# Altium PCB AirBnB-v1.0.PcbDoc (part 6 of 6)
Units mil, origin at the board's own origin, x right, y up, seen from the top; angles counter-clockwise.
Board outline 3937 x 3937 mil, 4 copper layers (Top Layer, Signal + GND, Signal + 3v3, Bottom Layer), stack 62.417 mil thick; 240 components, 168 nets, 829 pads, 395 vias.
Unrouted connection lines stored in the file: 6.
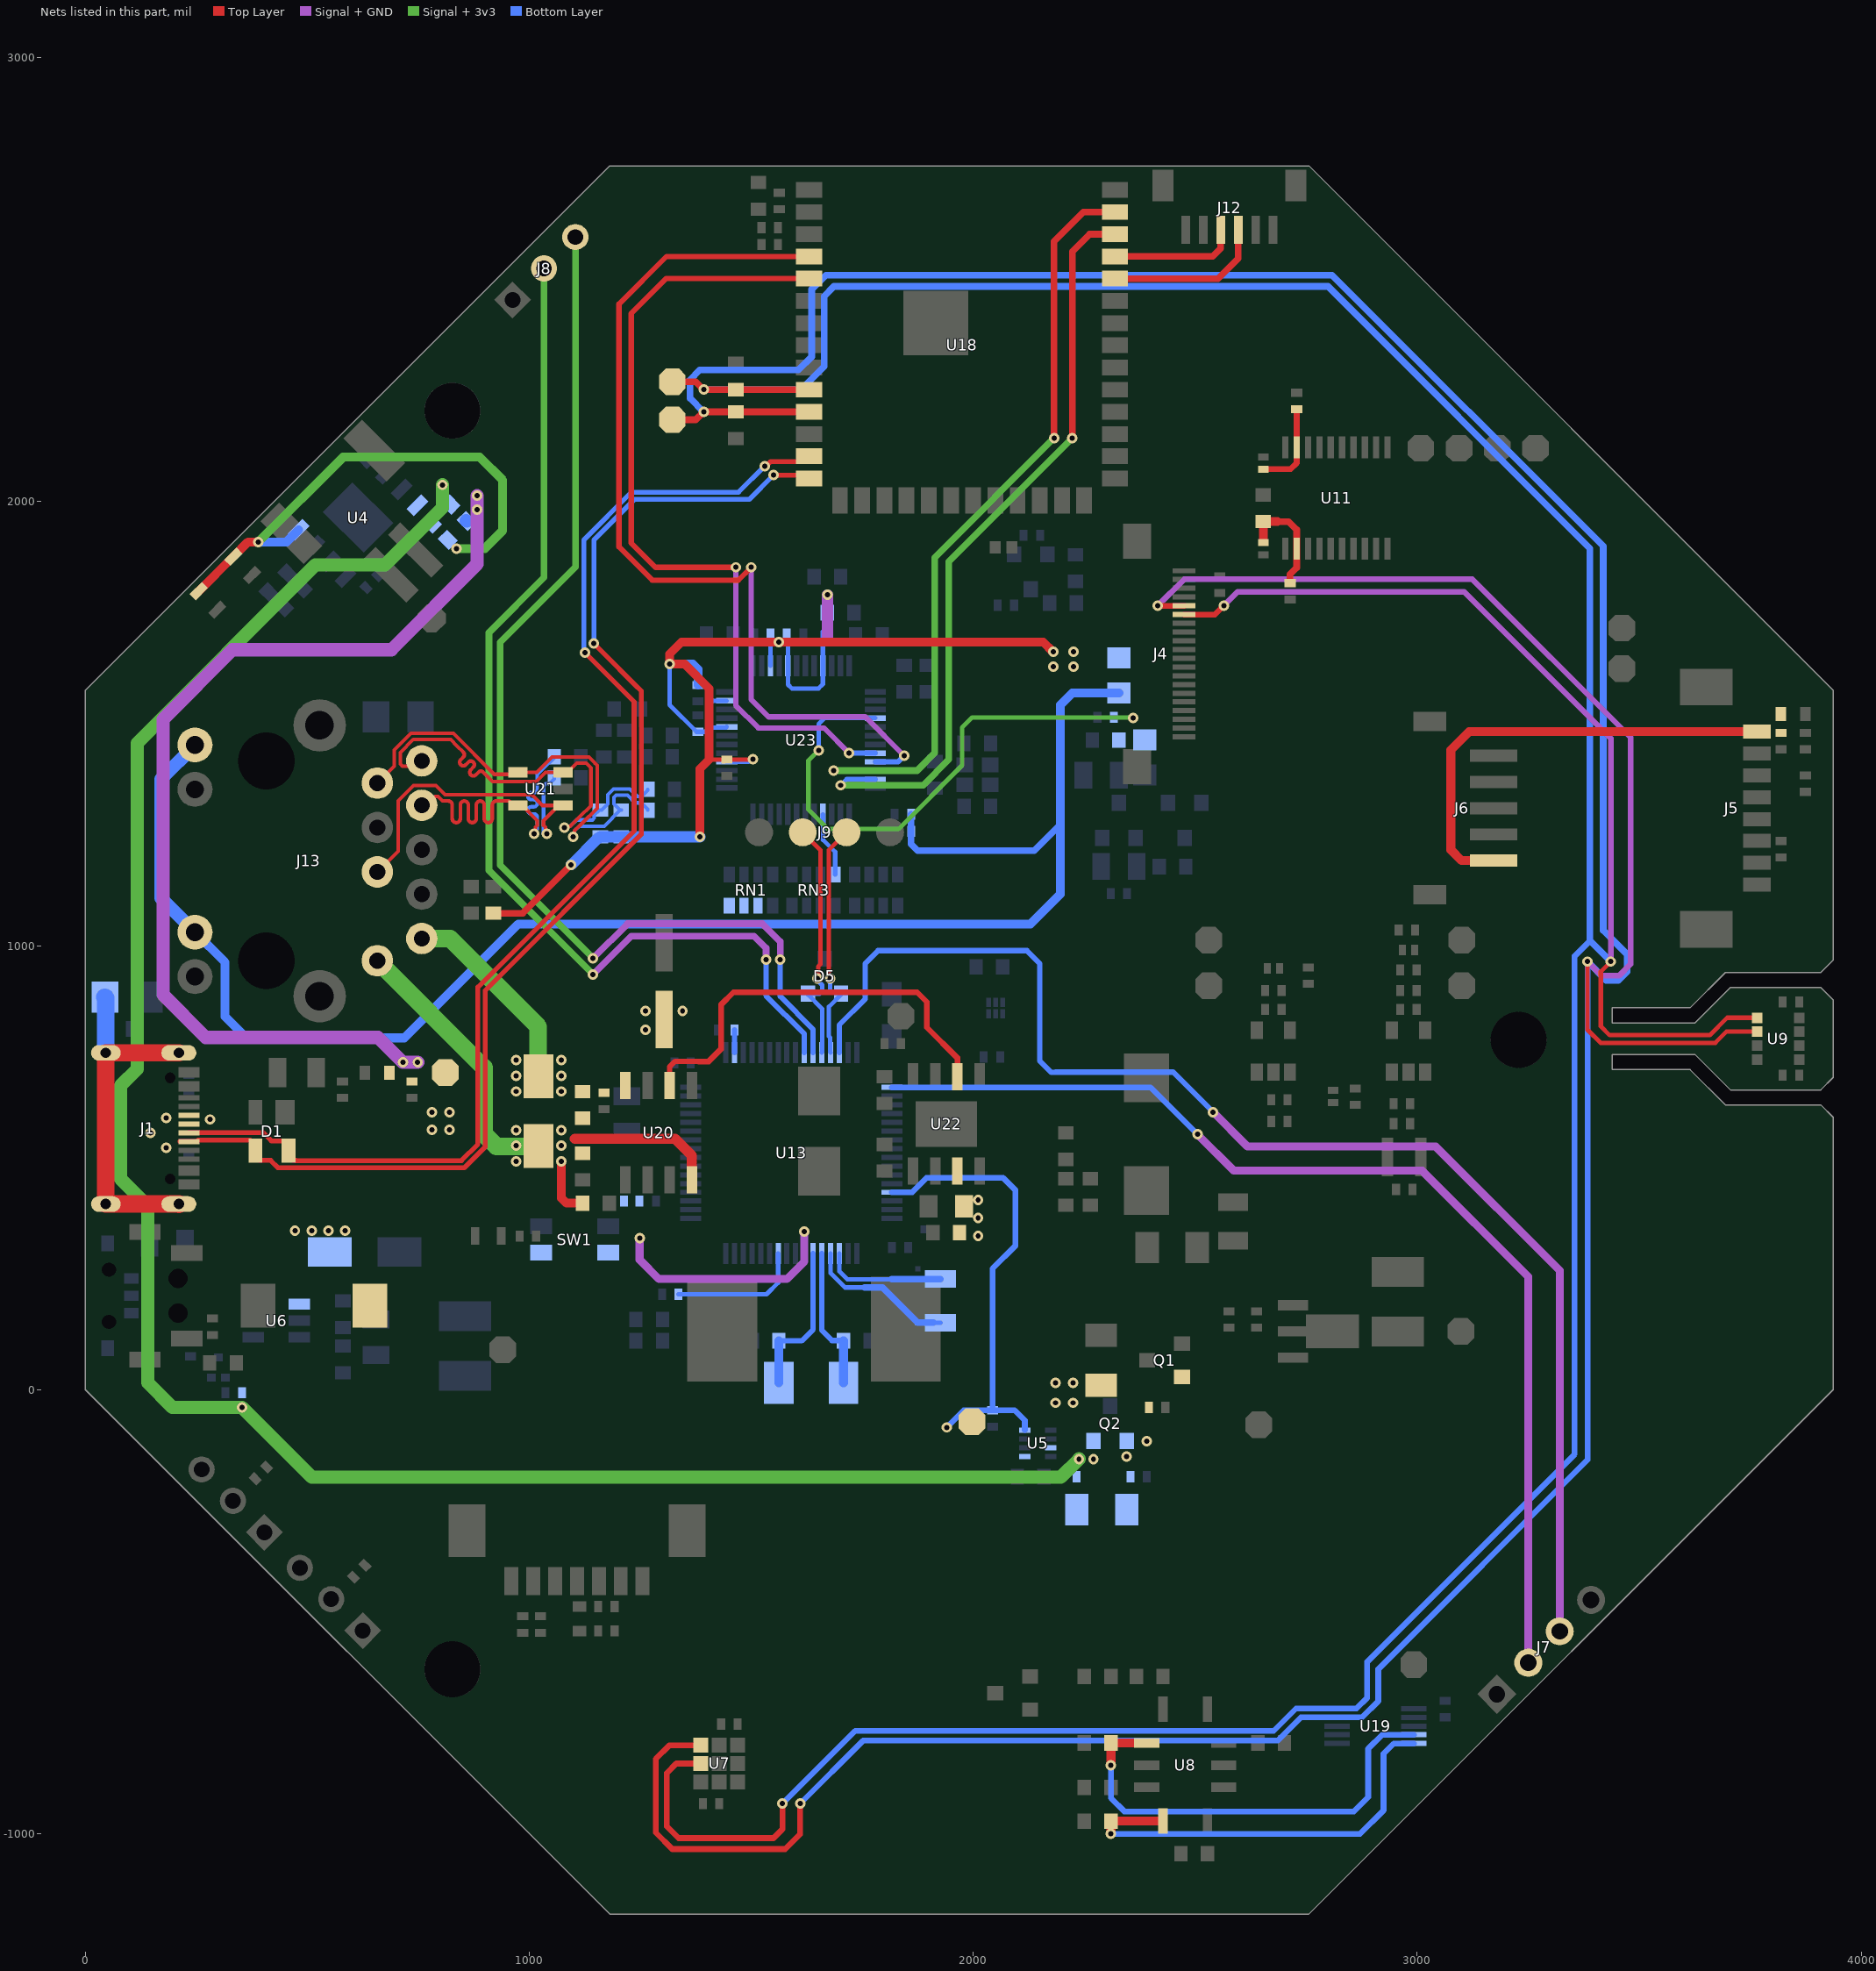
[diagram p5: the nets of this part, all layers, seen from the top]

## Via types
v1: diameter 23.62, hole 11.81, Top Layer to Bottom Layer, 392 vias
v2: diameter 23.62, hole 11.81, Top Layer to Bottom Layer, tented top, 3 vias

## Nets (pads, with @x,y where several pads share a name; then routed paths per layer and width w, separated by ;. In a path a pad name is that pad's centre, name@x,y a point inside that pad or via, vN(x,y) a via of type N, cw(c..) or ccw(c..) an arc to the next point about the centre after c; other vN are vias at no path point) (continued)
NetRN3_8: RN3.8 U23.40 | length 147.1
  Bottom Layer w10: U23.40@1661.21,1295.68 1661.21,1238.49 1688.82,1210.89 RN3.8@1688.82,1160
NetU20_6: U20.6 U22.6 | length 955.4
  Top Layer w12: U20.6@1316.19,685 1316.19,727.56 1327.63,739 1381.25,739
  Top Layer w13: 1381.25,739 1403.89,739 1431.69,766.8 1431.69,866.69 1459.87,894.87 1873.59,894.87 1895.36,873.11 1895.36,815.97 1964.08,747.24 U22.6@1964.08,704.74
NH3: R21.2 U8.D U19.5 | length 987.3
  Top Layer w20: v1(2309.98,-1000.35) R21.2@2309.98,-971.81 U8.D@2427.36,-971.81
  Bottom Layer w13: v1(2309.98,-1000.35) 2871.23,-1000.35 2923.97,-947.62 2923.97,-819.85 2946.81,-797 U19.5@2992.23,-797
NO2: R20.2 U8.A U19.4 | length 1034.7
  Top Layer w20: v1(2309.98,-845.83) R20.2@2309.98,-795.83 U8.A@2390.75,-795.83
  Bottom Layer w13: v1(2309.98,-845.83) 2309.98,-919.84 2339.95,-949.81 2857.13,-949.81 2889.45,-917.49 2889.45,-808.65 2920.79,-777.31 U19.4@2992.23,-777.31
NRST: C37.2 R27.2 SW1.1 U13.7 | length 571.2
  Signal + GND w18: v1(1249,341) 1248.26,340.26 1248.26,292.74 1292,249 1580,249 1619.53,288.53 v1(1619.53,356)
  Bottom Layer w12: U13.7@1619.53,306.62 v1(1619.53,356)
OSCIN: C40.2 U13.3 X1.1 | length 274.7
  Bottom Layer w10: U13.3@1698.27,306.62 1698.27,266.61 1716.11,248.77 1816.38,248.77
  Bottom Layer w15: 1816.38,248.77 C40.2@1874.71,248.77 X1.1@1925.56,248.77
OSCOUT: C46.2 U13.4 X1.2 | length 337.8
  Bottom Layer w10: U13.4@1678.58,306.62 1678.58,262.51 1711.04,230.05 1755,230.05 ; X1.2@1909.5,150.79 X1.2@1926,150.79
  Bottom Layer w15: 1755,230.05 1795.45,230.05 C46.2@1874.71,150.79 X1.2@1909.5,150.79
PB13: SB1.1 U13.34 | length 50.6
  Bottom Layer w12: U13.34@1462.05,759.38 SB1.1@1462.05,810
PC2: SB2.1 U13.10 | length 300.9
  Bottom Layer w10: SB2.1@1336,214.87 1534.37,214.87 1560.47,240.97 U13.10@1560.47,306.62
PMS_5V: C30.2 FB6.1 J5.1 J6.1 | length 1037.7
  Top Layer w20: J6.1@3171.85,1191.39 3099.95,1191.39 3075.58,1215.76 3075.58,1440.58 3116.74,1481.74 J5.1@3765.09,1481.74
POE_PWR_N: C63.1 D6.2 J13.10 R45.1 R47.1 U20.4 | length 1075.7
  Top Layer w20: v1@1073.03,514.11 v1(1072,514.11) 1072,431.72 1083.72,420 R47.1@1120,420
  Top Layer w23: 1102.5,565 1328.46,565 1366.19,527.26 U20.4@1366.19,472.4
  Signal + 3v3 w39.37: J13.10@657.63,965.95 897.89,725.69 897.89,575.91 925.78,548.02 1001.98,548.02
  other v1: 970,514.11 970,549.32 1072,549.32 970,584.52 1072,584.52
POE_PWR_P: C63.2 C67.1 D6.1 J13.9 R46.2 R52.2 R54.2 U20.8 U22.3 | length 455.3
  Signal + 3v3 w39.37: J13.9@757.63,1015.95 821.63,1015.95 1020,817.58 1020,706.8
  other v1: 2010.83,346 2010.83,386.5 2010.83,427 970,671.59 1072,671.59 970,706.8 1072,706.8 970,742 1072,742 1262,810 1262,853 1345.12,853
PWR_STAT: P9.1 R13.1 U5.8 U13.61 | length 1043.7
  Bottom Layer w13: U13.61@1816.38,444.42 1862.18,444.42 1894.44,476.67 2067.32,476.67 2095,449 2095,324.45 2043.39,272.83 R13.1@2043.39,-46.43 ; v1(1940,-85) 1978.57,-46.43 R13.1@2043.39,-46.43 ; U5.8@2116,-91.31 2116,-69.34 2093.09,-46.43 R13.1@2043.39,-46.43
RD_N: C65.1 J13.6 U21.1 | length 820.9
  Top Layer w8: J13.6@657.63,1165.95 704.44,1212.76 704.44,1325.59 739.23,1360.38 788.14,1360.38 789.62,1360.38 810.41,1339.59 886.62,1339.59 1005.82,1339.59 1029.81,1315.6 U21.1@1066.34,1315.6 ; v1(1039.31,1251.52) 1036.32,1254.51 1036.32,1266.73 1032,1271.05 1032,1281.26 U21.1@1066.34,1315.6 ; U21.1@1076.18,1315.6 U21.1@1066.34,1315.6
  Bottom Layer w8: v1@1032,1251.52 1032,1263.05 ; v1(1039.31,1251.52) 1039.31,1255.74 1032,1263.05 ; C65.1@1056,1378 1056,1375.5 1045,1364.5 1036.69,1364.5 1036.49,1364.31 1032,1359.81 1032,1271.39 1032,1263.05
RD_P: C66.1 J13.3 U21.5 | length 820.6
  Top Layer w8: J13.3@757.63,1315.95 759.45,1315.95 767.95,1315.95 787.79,1335.79 794.41,1335.79 804.61,1325.59 817.45,1325.59 cw(c817.45,1316.59) 826.45,1316.59 826.45,1285.91 ccw(c835.45,1285.91) 844.45,1285.91 844.45,1316.59 cw(c853.45,1316.59) 862.45,1316.59 862.45,1285.91 ccw(c871.45,1285.91) 880.45,1285.91 880.45,1316.59 cw(c889.45,1316.59) 898.45,1316.59 898.45,1285.91 ccw(c907.45,1285.91) 916.45,1285.91 916.45,1316.59 cw(c925.45,1316.59) 925.45,1325.59 950.98,1325.59 953.98,1325.59 963.98,1315.6 U21.5@973.82,1315.6 983.66,1315.6 1018,1281.26 1018,1271.05 1013.68,1266.73 1013.68,1254.51 v1(1010.69,1251.52)
  Bottom Layer w8: v1(1010.69,1251.52) 1010.69,1255.74 1018,1263.05 1018,1284.59 1018,1288.59 ccw(c1010,1288.59) 1010,1296.59 1004.58,1296.59 cw(c1004.58,1304.59) 1004.58,1312.59 1010,1312.59 ccw(c1010,1320.59) 1010,1328.59 1004.58,1328.59 cw(c1004.58,1336.59) 1004.58,1344.59 1010,1344.59 ccw(c1010,1352.59) 1018,1352.59 1018,1384 1018,1385.23 1044.27,1411.5 1045,1411.5 1056,1422.5 C66.1@1056,1425
RXD: J12.4 U18.36 | length 361.4
  Top Layer w15: U18.36@2318.95,2502 2551.16,2502 2596.69,2547.52 J12.4@2596.69,2612.3
SCL: J4.6 P13.1 R37.1 U7.2 U9.4 U18.10 U19.10 | length 9720.6
  Top Layer w10: v1(3436,964) 3413.39,941.39 3413.39,818.1 3433.36,798.13 3658.68,798.13 3698.04,837.5 U9.4@3765.51,837.5
  Top Layer w13: U7.2@1386.39,-842 1331.07,-842 1309.93,-863.14 1309.93,-983.71 1336.22,-1010 1550,-1010 1570,-990 v1(1570,-932.27) ; J4.6@2474.76,1745.58 2544.32,1745.58 v1(2564,1765.27)
  Top Layer w15: P13.1@1322,2269.72 1375,2269.72 v1(1392.72,2252) R37.1@1465,2252 U18.10@1629.97,2252
  Signal + GND w13: v1(2564,1765.27) 2595.73,1797 3105.17,1797 3436,1466.17 v1(3436,964)
  Bottom Layer w13: v1(1570,-932.27) 1733.92,-768.35 2676.65,-768.35 2726.74,-718.26 U19.10@2819,-718.26 2862.95,-718.26 2887.31,-693.9 2887.31,-612.69 3354.44,-145.56 3354.44,976.44 3389,1011
  Bottom Layer w15: v1(1392.72,2252) 1611.77,2252 1663.82,2304.05 1663.82,2462.63 1685.74,2484.55 2799.2,2484.55 3389,1894.75 3389,1011 v1(3436,964)
SDA: J4.5 P14.1 R38.1 U7.1 U9.3 U18.11 U19.9 | length 10440.2
  Top Layer w10: v1(3383.4,964) 3383.4,810.58 3412.86,781.12 3671.12,781.12 3696,806 U9.3@3765.51,806
  Top Layer w13: U7.1@1386.39,-800.66 1315.7,-800.66 1285,-831.36 1285,-997.78 1321.91,-1034.69 1576.31,-1034.69 1610,-1001 v1(1610,-932.27) ; v1(2415.27,1765.27) J4.5@2474.76,1765.27
  Top Layer w15: P14.1@1322,2184.28 1375,2184.28 v1(1392.72,2202) R38.1@1465,2202 U18.11@1629.97,2202
  Signal + GND w13: v1(2415.27,1765.27) 2475,1825 3124,1825 3480.46,1468.54 3480.46,958.46 3454.13,932.13 3415.27,932.13 v1(3383.4,964)
  Bottom Layer w13: v1(1610,-932.27) 1751.69,-790.58 2685.47,-790.58 2738.1,-737.94 U19.9@2819,-737.94 2875.73,-737.94 2912.05,-701.63 2912.05,-629.41 3383.4,-158.05 v1(3383.4,964)
  Bottom Layer w15: v1(1392.72,2202) 1362,2232.72 1362,2274 1384,2296 1606,2296 1636,2326 1636,2478 1668,2510 2808.26,2510 3418.88,1899.38 3418.88,1034.3 3472.93,980.25 3472.93,941.71 3453.11,921.89 3425.51,921.89 v1(3383.4,964)
Shell: C2.2 J1.S1 J1.S2 J1.S3 J1.S4 R1.2 | length 796.6
  Top Layer w39.37: J1.S4@210.69,758.5 J1.S3@46.12,758.5 J1.S2@46.12,417.95 J1.S1@210.69,417.95 J1.S1@211.1,417.53
  Bottom Layer w39.37: C2.2@44.12,884 46.12,882 R1.2@46.12,812.5 J1.S3@46.12,758.5
SPI2_CS_IO5: U18.5 U23.32 | length 1877.8
  Top Layer w12: v1(1465,1851.95) 1284.05,1851.95 1229.52,1906.48 1229.52,2423.52 1308,2502 U18.5@1629.97,2502
  Signal + GND w12: v1(1465,1851.95) 1465,1541.16 1516.03,1490.13 1663.61,1490.13 v1(1720.27,1433.47)
  Bottom Layer w12: v1(1720.27,1433.47) U23.32@1779.32,1433.47
SPI2_MISO_IO1: U18.39 U23.34 | length 1766.9
  Top Layer w12: v1@2181.94,2143.22 v1(2182.16,2143)
  Top Layer w15: v1@2181.94,2143.22 2181.94,2585.94 2248,2652 U18.39@2318.95,2652
  Signal + 3v3 w15: v1(1685,1394.1) 1873.33,1394.1 1913.01,1433.79 1913.01,1873.85 v1(2182.16,2143)
  Bottom Layer w12: v1(1685,1394.1) U23.34@1779.32,1394.1
SPI2_MOSI_IO2: U18.38 U23.35 | length 1722
  Top Layer w12: v1@2222.78,2143.22 v1(2223,2143)
  Top Layer w15: v1@2222.78,2143.22 2222.78,2562.78 2262,2602 U18.38@2318.95,2602
  Signal + 3v3 w15: v1(1701.61,1361.03) 1886.92,1361.03 1945,1419.11 1945,1865 v1(2223,2143)
  Bottom Layer w12: v1(1701.61,1361.03) 1715,1374.42 U23.35@1779.32,1374.42
SPI2_SCK_IO4: U18.4 U23.33 | length 2125.8
  Top Layer w12: v1(1500,1851.95) 1471.05,1823 1277,1823 1201.89,1898.11 1201.89,2444.89 1309,2552 U18.4@1629.97,2552
  Signal + GND w12: v1(1500,1851.95) 1500,1554.02 1538.86,1515.16 1756.86,1515.16 v1(1844.33,1427.69)
  Bottom Layer w12: U23.33@1779.32,1413.79 1830.42,1413.79 v1(1844.33,1427.69)
SW_12V: D4.2 L2.2 U6.1
  other v1: 472,358 509.67,358 547.33,358 585,358
SWCLK: J7.2 U13.49 | length 2479.3
  Signal + GND w18: v1(2505,575) 2586.69,493.31 3010.69,493.31 3250,254 J7.2@3250,-615
  Bottom Layer w13: U13.49@1816.38,680.64 2399.36,680.64 v1(2505,575)
SWDIO: J7.3 U13.46 | length 3040.1
  Signal + GND w18: v1(2540,625) 2617.39,547.61 3041.39,547.61 3320.71,268.29 J7.3@3320.71,-544.29
  Bottom Layer w12: U13.46@1698.27,759.38 1698.27,821.43 1756.21,879.38 1756.21,959.4 1785.48,988.67 2120.6,988.67 2150,959.26 2150,740 2175.03,714.97 2184.97,714.97 ; 2185,715 2450,715 v1(2540,625)
TD_N: J13.2 R59.1 R63.1 U21.4 | length 1076
  Top Layer w8: J13.2@657.63,1365.95 695.32,1403.63 695.32,1440.51 732.81,1478 828.8,1478 921.08,1385.72 969.13,1385.72 U21.4@973.82,1390.4 1016.29,1390.4 1050.89,1425 1133.8,1425 1148.59,1410.21 1152.69,1406.11 1152.69,1309.55 1118.23,1275.1 1101.84,1258.7 1101.84,1248.36 v1(1098.85,1245.37)
  Bottom Layer w8: v1(1098.85,1245.37) 1101.84,1248.36 1101.84,1258.7 1112.14,1269 1169.23,1269 1186.5,1286.27 1186.5,1287 R59.1@1204.5,1305 ; R59.1@1207,1305 R59.1@1204.5,1305 ; R63.1@1267,1305 1267,1307.5 1253,1321.5 1237.63,1321.5 1220.71,1338.41 1195.19,1338.41 1190.5,1333.73 1190.5,1319 R59.1@1204.5,1305
TD_P: J13.1 R58.1 R64.1 U21.3 | length 1074.1
  Top Layer w8: J13.1@757.63,1415.95 745.6,1403.92 714,1403.92 709.32,1408.6 709.32,1434.71 738.61,1464 823,1464 837.14,1449.86 851.29,1435.72 cw(c845.63,1430.06) 851.29,1424.4 845.44,1418.56 ccw(c851.1,1412.9) 845.44,1407.25 ccw(c851.1,1412.9) 856.76,1407.25 862.6,1413.09 cw(c868.26,1407.43) 873.91,1413.09 cw(c868.26,1407.43) 873.91,1401.77 868.07,1395.93 ccw(c873.73,1390.28) 868.07,1384.62 ccw(c873.73,1390.28) 879.39,1384.62 885.23,1390.46 cw(c890.88,1384.8) 896.54,1390.46 905.56,1381.44 917.41,1369.59 1016,1369.59 1036.81,1390.4 U21.3@1076.18,1390.4 1086.02,1390.4 1106.62,1411 1128,1411 1138.69,1400.31 1138.69,1315.35 1112.43,1289.1 1091.94,1268.6 1081.6,1268.6 v1(1078.61,1265.61)
  Bottom Layer w8: v1(1078.61,1265.61) 1081.6,1268.6 1091.94,1268.6 1106.34,1283 1141.81,1283 1146.5,1287.69 1146.5,1294 1157.5,1305 1162.5,1305 1176.5,1319 1176.5,1339.53 1189.39,1352.41 1226.51,1352.41 1243.43,1335.5 1253,1335.5 1267,1349.5 R64.1@1267,1352
TXD: J12.3 U18.37 | length 288.1
  Top Layer w15: U18.37@2318.95,2552 2539.32,2552 2557.32,2570 J12.3@2557.32,2612.3
USART1_RX: J8.3 U13.43 | length 2532
  Signal + GND w15: v1(1143.4,971.6) 1221.19,1049.38 1524.47,1049.38 1565,1008.85 v1(1565,968.31)
  Signal + 3v3 w15: J8.3@1103.71,2595.71 1103.71,1852.71 933.98,1682.98 933.98,1181.02 v1(1143.4,971.6)
  Bottom Layer w12: v1(1565,968.31) 1565,885.52 1639.21,811.3 U13.43@1639.21,759.38
USART1_TX: J8.2 U13.42 | length 2446.2
  Signal + GND w15: v1(1143.4,935) 1229.85,1021.45 1506.43,1021.45 1533.19,994.69 v1(1533.19,968.31)
  Signal + 3v3 w15: J8.2@1033,2525 1033,1829 909.05,1705.05 909.05,1169.36 v1(1143.4,935)
  Bottom Layer w12: v1(1533.19,968.31) 1533.19,887.29 1619.53,800.95 U13.42@1619.53,759.38
USB_D_N: D5.2 J9.3 U13.44 | length 562.3
  Top Layer w10: J9.3@1615.79,1255 1655.5,1215.29 1655.5,957.86 1650.45,952.81 1650.45,927.76 v1(1648.69,926)
  Bottom Layer w10: v1(1648.69,926) 1648.69,922.31 1659.8,911.2 1659.8,897.49 1653.95,891.63 D5.2@1627.4,891.63 1627.4,889.66 1659.8,857.26 1659.8,760.28 U13.44@1658.9,759.38
USB_D_P: D5.1 J9.2 U13.45 | length 547.2
  Top Layer w10: v1(1677.31,926) 1674.89,928.42 1674.89,1215.68 J9.2@1714.21,1255
  Bottom Layer w10: v1(1677.31,926) 1677.31,897.61 1680.66,894.26 1699.58,894.26 D5.1@1702.21,891.63 1702.21,889.66 1674.8,862.26 1674.8,795.76 1677.68,792.88 1677.68,760.28 U13.45@1678.58,759.38
USB_N: D1.4 J1.A7 J1.B7 U18.13 | length 2844.6
  Top Layer w11: J1.A7@233.13,578.38 401.17,578.38 419.17,560.38 447.63,560.38 457.87,550.13 457.87,526.51 468.12,516.26 474.07,516.26 474.57,515.76 847.15,515.76 884.24,552.85 884.24,906.47 1236,1258.22 1236,1549 v1(1125,1660) ; v1(1530,2080) 1533.42,2080 1543.2,2089.78 1617.76,2089.78 U18.13@1629.97,2102
  Bottom Layer w11: v1(1125,1660) 1122.93,1662.07 1122.93,1913.48 1230.44,2021 1471,2021 v1(1530,2080)
  other v1: 146.19,578.34 280.62,608.42
USB_P: D1.3 J1.A6 J1.B6 U18.14 | length 2859
  Top Layer w11: J1.B6@213.23,558.62 250.92,558.62 254.17,561.88 371.32,561.88 383.07,550.13 D1.3@383.07,538.32 383.07,526.51 393.32,516.26 417.33,516.26 433.83,499.76 853.78,499.76 900.24,546.22 900.24,898.69 1252,1250.44 1252,1573.48 1238.48,1587 1165.48,1660 v1(1145.24,1680.24) ; v1@1545.78,2064.22 v1(1550.24,2059.76) 1622.21,2059.76 U18.14@1629.97,2052
  Bottom Layer w11: v1(1145.24,1680.24) 1145.24,1913.17 1237.07,2005 1495.48,2005 v1(1550.24,2059.76)
  other v1: 182.12,544.77 182.12,611.84
VBUS: C11.2 D2.2 D3.2 FB2.2 P1.1 Q1.1 Q2.1 R4.1 R8.1 SB4.1 U5.5 | length 2264.2
  Signal + GND w30: v1(748.5,737.43) v1(715,737.43) 659.3,793.13 271.17,793.13 175.16,889.14 175.16,1509.85 331.49,1666.18 689.37,1666.18 882.55,1859.36 v1(882.55,1982) v1(882.55,2013)
  Bottom Layer w30: SB4.1@857.97,1957.42 SB4.1@859.01,1956.37
  other v1: 2345.41,-150.37 2390.86,-115.68 2185,-29.68 2225,-29.68 2185,15 2225,15 781,585 820,585 781,624.93 820,625
VCCA: C34.2 FB7.2 R26.2 U11.2 | length 248.4
  Top Layer w15: 2685.19,1955 2709.83,1955 2728.34,1936.5 U11.2@2728.34,1894.09 2728.34,1850.95 2713.46,1836.07 C34.2@2713.46,1816.47
  Top Layer w20: 2653,1915.74 R26.2@2653,1955 2685.19,1955
VCCB: C35.2 FB8.2 U11.19 | length 202.3
  Top Layer w13: FB8.2@2653,2073 2714.56,2073 2728.34,2086.78 U11.19@2728.34,2122.43 C35.2@2728.34,2208
VCHRG: LED1.1 LED2.1 SB3.2 SB4.2 U4.4 U4.8 | length 1167
  Top Layer w20: LED1.1@255.42,1798.14 LED2.1@333.3,1876.02 ; LED2.1@333.54,1876.02 366.56,1909.04 v1(389.63,1909.04)
  Signal + 3v3 w20: v1(389.63,1909.04) 580.59,2100 888.28,2100 940,2048.28 940,1934.62 899.62,1894.24 v1(835.87,1894.24)
  Bottom Layer w20: v1(389.63,1909.04) 453.09,1909.04 U4.8@480.1,1936.05
VDD: C72.2 C73.2 FB9.2 FB10.1 J13.11 J13.13 R68.1 R69.1 RN1.6 RN1.7 RN1.8 U23.28 | length 4981
  Signal + 3v3 w10: v1(1651.54,1439.77) 1628.59,1416.82 1628.59,1306.41 1672.48,1262.52 1831.56,1262.52 1974.89,1405.84 1974.89,1491.28 1997.61,1514 2359,1514 v1(2360,1513)
  Bottom Layer w10: v1(1651.54,1439.77) 1651.54,1498.83 1664.92,1512.21 U23.28@1779.32,1512.21
  Bottom Layer w15: R68.1@1859.9,1296 R69.1@1859.9,1257 1859.9,1228.8 1874.86,1213.84 2137.65,1213.84 2195.9,1272.1
  Bottom Layer w20: J13.13@247,1030.12 314.35,962.77 314.35,840.53 362.88,792 718.45,792 974.97,1048.52 2128.52,1048.52 2195.9,1115.9 2195.9,1272.1 2195.9,1541.88 2223.02,1569 FB10.1@2328,1569
  Bottom Layer w30: J13.13@247,1030.12 170,1107.12 170,1374.77 J13.11@247,1451.77
VDDA: C77.2 C79.2 C81.2 C82.2 C83.2 C84.2 FB10.2 R50.2 R58.2 R59.2 U23.4 U23.8 U23.11 U23.15 U23.17 U23.21 | length 3064.8
  Top Layer w10: 1405,1418.9 C79.2@1444.68,1418.9 1502.55,1418.9 v1(1503.73,1420.09)
  Top Layer w15: R50.2@919,1073 985,1073 v1(1094,1182)
  Top Layer w20: v1(1384.14,1245) 1384.14,1398.04 1405,1418.9 1405,1579 1350,1634 v1(1316,1634) 1316,1657 1342.53,1683.53 v1(1561.95,1683.53) 2157.49,1683.53 2179.02,1662 v1(2180,1662)
  Signal + GND w25: v1(1671.39,1790) 1671.39,1687.61 1673,1686
  Bottom Layer w10: v1(1316,1634) 1316,1542 1376.5,1481.5 C77.2@1380,1481.5 1402.33,1481.5 1412.06,1491.23 1443.38,1491.23 U23.8@1444.61,1492.46 ; C81.2@1380,1587 1382.04,1584.96 1400.67,1584.96 1406.53,1579.1 1406.53,1557.4 1412.45,1551.47 1444.57,1551.47 U23.11@1444.68,1551.58 ; U23.4@1444.68,1413.79 1493.75,1413.79 ; U23.15@1543.1,1630.32 1543.1,1677.16 1549.47,1683.53 v1(1561.95,1683.53) 1576.11,1683.53 1582.47,1677.16 U23.17@1582.47,1630.32 1582.47,1587.81 1591.18,1579.1 1651.51,1579.1 1661.21,1588.81 U23.21@1661.21,1630.32 1661.21,1707.55 1671.21,1717.55 ; 1671.18,1717.58 C84.2@1671.18,1749.51 C84.2@1671.39,1749.72
  Bottom Layer w20: v1(1316,1634) 1368.28,1634 1380,1622.28 C81.2@1380,1587
  Bottom Layer w25: v1(1094,1182) 1094.5,1182 1155,1242.5 1157.5,1242.5 R58.2@1160,1245 ; R58.2@1165,1245 R59.2@1207,1245 v1(1384.14,1245) ; C84.2@1671.39,1749.72 v1(1671.39,1790)
  other v1: 2180,1628 2225.54,1628 2225.54,1662
VIN1: D3.1 Q2.2 R9.2 R11.2 SB3.1 U5.3 | length 4641.8
  Signal + 3v3 w30: v1(804.21,2037.57) 804.21,1986.21 675.05,1857.05 518.05,1857.05 116.92,1455.92 116.92,721.92 79.58,684.58 79.58,474.41 140.33,413.67 140.33,15.71 196.04,-40 v1(352.75,-40) 509.72,-196.97 2197.3,-196.97 v1(2238,-156.28)
  other v1: 2270.61,-156.28
XTAL_IN: C41.2 U13.5 X2.1 | length 326.7
  Bottom Layer w12: U13.5@1658.9,306.62 1658.9,133.41 1681.67,110.64 1707,110.64 C41.2@1707.64,110
  Bottom Layer w20: X2.1@1707.64,15 C41.2@1707.64,110
XTAL_OUT: C44.2 U13.6 X2.2 | length 353.9
  Bottom Layer w12: C44.2@1561.97,110 1613.62,110 1639.21,135.59 U13.6@1639.21,306.62
  Bottom Layer w20: X2.2@1561.97,15 C44.2@1561.97,110
pads on no net: J1.A8 J1.B8 J1.MH J2.MP1 J2.MP2 J3.1 J3.2 J3.7 J3.8 J3.9 J5.7 J5.8 J5.S1 J5.S2 J6.4 J6.6 J6.7 J9.4 J12.MP1 J12.MP2 J13.MH RN1.4 RN1.5 RN2.1 RN2.2 RN2.7 RN2.8 SW2.MH SW2.MP SW3.2 SW3.4 SW3.5 SW3.MH U1.4 U2.4 U6.6 U7.6 U7.9 U12.5 U13.2 U13.8 U13.9 U13.11 U13.14 U13.15 U13.21 U13.22 U13.24 U13.25 U13.26 U13.27 U13.29 U13.33 U13.35 U13.37 U13.38 U13.39 U13.40 U13.41 U13.50 U13.51 U13.52 U13.53 U13.54 U13.55 U13.56 U13.57 U13.58 U13.59 U13.62 U18.15 U18.16 U18.28 U18.29 U18.30 U19.7 U20.7 U23.7 U23.12 U23.13 U23.18 U23.24 U23.26 U23.46 U23.47

## Polygon pours and split planes (outlines as drawn)
3V3 on Signal + 3v3 "3V3_L03_P003" (solid, pour order 3): 1197,-1149 2747.5,-1149 3908.94,12.44 3908.94,615 3678.2,615 3588.2,705 3425,705 3425,770 3425,810 3425,876.75 3589.95,876.75 3674.2,961 3910,961 3910,1565 2744,2731 1196,2731 28.53,1563.53 28.53,19.47
VBUS on Signal + 3v3 "VBUS_L03_P002" (solid, remove dead copper, pour order 2): 749,19 814,-46 2250,-46 2250,32 879.23,32 845.09,66.13 845.09,650 749,650
GND on Bottom Layer "GND_L04_P012" (solid, remove dead copper, pour order 12): 1198,-1150 2746,-1150 3908.94,12.94 3908.94,597 3889.93,616 3686.44,616 3599,703.44 3425,703.44 3425,775 3425,815.34 3425,877.44 3599,877.44 3682.56,961 3876,961 3908.94,993.94 3908.94,1566.06 2745,2730 1195,2730 28.53,1563.53 28.53,19.47
5V on Bottom Layer "5V_L04_P009" (solid, remove dead copper, pour order 9): 2187.46,-105.09 2159.53,-105.09 2155.74,-101.3 2155.74,35.74 2165,45 2291.87,45 2291.87,220 2075,220 2075,-20.57 2084.11,-29.68 2106.68,-29.68 2133.96,-56.96 2133.96,-100.32 2129.19,-105.09 2102.81,-105.09 2102.81,-116.91 2187.46,-116.91 2102.81,-116.91 2187.46,-116.91
VIN1 on Bottom Layer "VIN1_L04_P005" (solid, pour order 5): 2153.2,-122.9 2192.3,-122.9 2226.6,-88.6 2286.75,-88.6 2286.75,-305.43 2206.43,-305.43 2206.43,-234.2 2220.19,-234.2 2220.19,-136.59 2153.2,-136.59
GND on Top Layer "GND_L01_P011" (solid, remove dead copper, pour order 11): 1198,-1150 2746,-1150 3908.94,12.94 3908.94,576.06 3875,610 3680.5,610 3587.07,703.44 3425,703.44 3425,775 3425,815.34 3425,890 3600,890 3677.26,967.26 3882.26,967.26 3908.94,993.94 3908.94,1565.06 2744,2730 1195,2730 35,1570 35,13
3V3 on Top Layer "3V3_L01_P013" (solid, pour order 13): 2685.77,142.42 2712.41,169.05 2723.35,180 3164,180 3164,-117 3161,-120 2793,-120 2793,92.95 2712.41,92.95 2685.77,119.58
5V on Top Layer "5V_L01_P000" (solid, remove dead copper, pour order 0): 2132.85,95.92 2132.85,220 2480.04,220 2551.54,148.5 2650.5,148.5 2650.5,84.15 2764.41,84.15 2764.41,-120 2520,-120 2520,84.15 2450.5,84.15 2436.96,95.92
GND on Signal + GND "GND_L02_P004" (solid, remove dead copper, pour order 4): 1197,-1149 2747,-1149 3908.94,12.94 3908.94,616.26 3686.18,616.26 3599.38,703.06 3425,703.06 3425,765 3425,815 3425,877.44 3599.38,877.44 3694.2,972.26 3908.94,972.26 3908.94,1565.06 2743,2731 1195,2731 32,1568 32,16

## Other copper
Top Layer:
  region net 5V: 2659,96.09 2659,151.44 2252.57,151.44 2252.57,96.09
  rectangle net 5V: 3309.06,-225 3363,456.73
  region net 5V: 3356,-226 3356,-158.88 2520,-158.88 2520,-226
  region net 5V: 3682.43,1156 3682.43,1205.84 3310,1205.84 3310,1156
  rectangle net 5V: 3310,434.12 3363,1205.17
  region net 5V: 3344,427.92 3344,479.12 2979.45,479.12 2979.45,427.92
  rectangle net Shell: 12.65,397.46 79.58,781.16
  rectangle net 3V3: 2819,-108 3139,178
  rectangle net 5V: 2520,-204 2749.35,84.15
  rectangle net NetR54_1: 1870.15,547 2008.02,649.87
  rectangle net #VBUS: 360.5,597.37 398.82,747.46
  rectangle net GND: 1532,612.52 1700.24,739
  rectangle net POE_PWR_P: 1952.27,333 1975.89,522.65
  rectangle net NetR54_1: 1902.27,387.56 1925.89,649.87
  rectangle net NetR54_1: 1879.08,387.56 1919.08,437.56
  rectangle net NetR54_1: 1902.27,461.63 1925.89,522.65
  rectangle net POE_PWR_P: 1954.08,333 2025.89,440.68
  rectangle net NetC74_2: 1768.95,234.79 2162.07,281.39
  rectangle net NetC74_2: 2094.79,243.01 2162,430.13
  rectangle net NetC74_2: 2094.79,386 2618.47,430.13
  rectangle net NetC74_2: 1768.95,213.89 2105.27,281.39
  rectangle net NetC74_2: 1768.95,17.89 1926.43,281.39
  rectangle net NetC71_1: 1355.57,17.89 1564,254.11
  rectangle net NetC71_1: 1484,17.89 1564,546.78
  rectangle net NetC71_1: 1605.75,461.63 1875.89,507.14
  rectangle net NetC71_1: 1484,436.54 1749,546.78
  rectangle net POE_PWR_P: 1160,762.52 1365,872
  rectangle net POE_PWR_P: 1160,762.52 1323.31,894
  rectangle net POE_PWR_P: 1160,654.49 1228,894
  rectangle net NetC74_2: 2191.08,393.38 2613.5,430.13
  rectangle net #VBUS: 317,670.9 452.76,712
  rectangle net #VBUS: 360.5,670.9 452.76,747.46
  rectangle net NetL2_1: 310,139.79 428.39,274.57
  rectangle net NetL2_1: 295.74,189 428.39,274.57
  rectangle net SW_12V: 594.25,139.79 680.35,376.29
  rectangle net SW_12V: 457.56,286 680.35,376.29
  rectangle net GND: 2449.17,1423 2534,1495.58
  rectangle net 3V3: 2542.5,1822.5 2567.5,1906
  rectangle net 3V3: 2427,1838.1 2567.5,1906
  rectangle net 3V3: 3861.62,1309.5 3886.62,1355.32
  rectangle net 3V3: 3806.5,1181.98 3861.62,1207.68
  rectangle net 3V3: 1452.34,-817.39 1539,-740.77
  rectangle net 5V_BOOST: 896.67,51 997,215
  rectangle net NetR45_2: 1204.38,441.89 1228,502.91
  rectangle net NetR45_2: 1102.5,457.4 1228,487.4
  rectangle net NetR47_2: 1165,402.5 1278,428.05
  rectangle net NetR47_2: 1254.38,402.5 1278,502.91
  rectangle net NetR47_2: 1165,402.5 1195,437.5
  region net NetC74_1: 2246,510.13 2246,460.13 2282.28,460.13 2282.28,510.13
  rectangle net POE_PWR_N: 953,517.4 1137.5,640.57
  rectangle net POE_PWR_P: 953,654.49 1228,755.05
  region net NetC74_1: 2191.08,533.52 2191.08,460.13 2226.08,460.13 2226.08,533.52
  rectangle net 5V: 3849.65,1470 3878.12,1562.12
  rectangle net PMS_5V: 3733.59,1466 3831.5,1537.25
  rectangle net 5V_PoE: 2349.36,49.86 2434.04,82.14
  rectangle net 3V3: 1458,2602 1539.5,2673.5
  rectangle net 3V3: 1460,2643.5 1529.5,2673.5
  rectangle net 3V3: 1460,2649.5 1659.5,2669.72
  rectangle net 3V3: 1600.45,2634.28 1659.5,2669.72
  rectangle net CH2O_5V: 1091.72,-500.91 1124.97,-400
  rectangle net CH2O_5V: 1091.72,-500.91 1163.97,-475.91
  rectangle net 5V: 1058.25,-556.03 1163.97,-531.03
  rectangle net 5V: 2109.87,-663.33 2264.98,-580
  rectangle net 3V3: 3848.19,695.5 3871.81,754.82
  rectangle net 3V3: 3848.19,695.5 3900,720.5
  rectangle net 3V3: 3848.19,860.5 3900,885.5
  rectangle net 3V3: 3848.19,794.19 3871.81,885.5
  rectangle net 3V3_AUD: 1926.35,810 2009.09,900
  rectangle net GPIO21: 218.8,11.91 299,42.11
  rectangle net GPIO21: 193.31,97.13 299,132.56
  rectangle net GPIO21: 265,11.91 299,132.56
  region net BATT: 586.88,1753.63 692.24,1859 653.6,1897.64 548.23,1792.27
  region net BATT: 769.12,1683.69 825.29,1739.87 660.56,1904.6 604.39,1848.43
  region net NetLED1_2: 290.22,1735.51 318.05,1763.34 304.13,1777.26 276.3,1749.43
  region net NetLED2_2: 368.34,1813.38 396.18,1841.22 382.26,1855.14 354.42,1827.3
  rectangle net ESP_EN: 1551,2584.28 1659.5,2619.72
  rectangle net 5V: 3861.62,1470 3886.62,1537.25
  rectangle net GND: 2925.97,2097.63 2955,2225
  rectangle net 1V8_SENSOR: 2681.62,936.63 2767.22,974.34
  rectangle net 1V8: 2624.53,789.8 2669.81,967.36
  region net NetC6_2: 2652.09,774.06 2624.53,774.06 2624.53,695.32 2652.09,695.32
  region net NetC6_2: 2734.49,774.06 2624.53,774.06 2624.53,750.43 2734.49,750.43
  rectangle net NetC6_2: 2698.99,586.5 2734.49,774.06
  rectangle net NetC6_2: 2698.99,586.5 2822.44,654
  rectangle net 3V3_CLEAN: 2798.81,665.81 2872.81,933
  rectangle net 3V3_CLEAN: 2798.81,863.73 2974.1,933
  rectangle net 3V3_SENSOR: 2985.91,978.19 3022.32,1047.5
  rectangle net 3V3_CLEAN: 2928.82,789.8 2974.1,1001.81
  rectangle net NetC4_2: 2920.4,747 3031.18,774.06
  rectangle net NetC4_2: 3003.62,695.32 3031.18,774.06
  rectangle net NetC4_2: 2917.52,480.69 2956.38,774.06
  rectangle net 5V: 2980.1,435 3024.87,569.51
  rectangle net PWR_STAT: 1926,-104 2028,-37
  rectangle net VBUS: 2330,-170 2404.5,36.08
  rectangle net VBUS: 760,565 841,757.79
  rectangle net VBUS: 673.23,680.54 841,757.78
  rectangle net NetC8_2: 500,680.54 641.73,747.46
  rectangle net #VBUS: 268.11,466.63 323.92,505.54
  rectangle net #VBUS: 209.5,481.92 323.92,505.54
  rectangle net USB_N: 267,591.23 293.79,623.65
  rectangle net USB_N: 209.5,611.84 293.79,623.65
  rectangle net USB_P: 169.71,592.16 256.75,603.97
  rectangle net USB_P: 169.71,592.16 197.5,623.86
  rectangle net USB_P: 169.71,529.21 197.5,564.45
  rectangle net USB_N: 132.62,572.47 256.75,584.28
  rectangle net USB_P: 169.71,552.79 256.75,564.45
  rectangle net #VBUS: 209.5,670.9 452.76,694.52
  rectangle net VBUS: 2164.89,-52.5 2404.5,36.08
  rectangle net VBUS: 2452.26,-16.68 2488.48,44.74
  rectangle net VBUS: 2252.57,-16.68 2488.48,36.08
  rectangle net 5V_PoE: 2346.25,243 2436.96,355.43
  rectangle net NetD8_2: 2477.85,284.57 2618.47,355.43
  rectangle net NetC74_2: 2339.41,393.38 2618.47,530.85
  region net NetC74_1: 2191.08,510.13 2191.08,480.13 2282.28,480.13 2282.28,510.13
  rectangle net POE_PWR_N: 953,499.14 1088,640.57
  rectangle net POE_PWR_P: 953,656.62 1088,755.05
  rectangle net NetC64_1: 851.5,1118 936.5,1148
  pour cut-out: 3425,755 3625.5,755 3705.5,675 3908.94,675 3937,703.06 3937,877.44 3908.94,905.5 3705.51,905.5 3625.5,825.5 3439,825.5 3625.5,825.5 3425,825.5
  pour cut-out: 610,1574.8 610,810 0,810 0,1574.8
Signal + GND:
  region net VDDA: 1543.28,1385 1543.28,1470 1270.28,1470 1270.28,1385
  rectangle net VDDA: 1305,1195 1413,1468
  rectangle net VDDA: 1077,1136 1413,1220
  region net VDDA: 1329.3,1178 1329.3,1677 1209.3,1677 1209.3,1178
  rectangle net VDDA: 1516,1594 2256,1714
  rectangle net BATT: 46.12,474.44 125.68,519.46
  rectangle net BATT: 357.49,1759 606,1810.11
  rectangle net VBUS: 867.19,1966.86 897.93,2026.05
  rectangle net BATT: 81.15,270.35 125.68,328.38
  region net BATT: 136.06,1531.33 393.55,1771.44 357.49,1810.11 100,1570
  rectangle net BATT: 93.91,659.13 140,1570
  rectangle net BATT: 46.12,659.13 140,704.14
  rectangle net BATT: 46.12,474.44 85.49,704.14
  rectangle net BATT: 89.64,270.35 125.68,513.81
  pour cut-out: 3425,755 3625.5,755 3705.5,675 3908.94,675 3937,703.06 3937,877.44 3908.94,905.5 3705.51,905.5 3625.51,825.5 3439,825.5 3625.51,825.5 3425,825.5
  pour cut-out: 610,1574.8 610,810 0,810 0,1574.8
Signal + 3v3:
  rectangle net POE_PWR_P: 1323.17,406.72 2036.17,466
  rectangle net POE_PWR_P: 1956.27,331.36 2036.17,466
  rectangle net POE_PWR_P: 1323,406.72 1391.09,868.62
  rectangle net POE_PWR_P: 1247.1,790 1391.09,868.62
  rectangle net VIN1: 2222.31,-170.08 2285,-140
  rectangle net 3V3_AUD: 1926.35,810 2009.09,900
  rectangle net POE_PWR_P: 953,656.62 1088,755.05
  rectangle net POE_PWR_N: 953,499.14 1088,597.57
  pour cut-out: 3425,755 3625.5,755 3705.5,675 3908.94,675 3937,703.06 3937,877.44 3908.94,905.5 3705.51,905.5 3625.5,825.5 3439,825.5 3625.5,825.5 3425,825.5
  pour cut-out: 610,1574.8 610,810 0,810 0,1574.8
Bottom Layer:
  rectangle net 3V3: 2859,-160 3044,89
  rectangle net 5V: 2515,-162 2764,56
  rectangle net NetR54_1: 1870.15,547 2008.02,649.87
  rectangle net 3V3_AUD: 1861,735.76 1905,900
  rectangle net NRST: 1204.5,412.23 1265.72,437.5
  rectangle net NRST: 1001.61,290.76 1248.5,326.66
  rectangle net 3V3_AUD: 1731.73,307 1825.38,330.24
  rectangle net NetL2_1: 295.74,100.64 345.02,274.57
  rectangle net SW_12V: 457.56,276.54 599.47,376.29
  rectangle net SW_12V: 457.56,180.71 547.61,376.29
  rectangle net #VBUS: 325.85,663 398,705.51
  region net NetQ5_3: 2187.09,1820.37 2082.76,1820.37 2082.76,1754 2187.09,1754
  region net GPIO47: 2182.7,1936.5 2138.66,1936.5 2138.66,1862.89 2182.7,1862.89
  region net GPIO47: 2247.44,1899.11 2150.42,1899.11 2150.42,1862.89 2247.44,1862.89
  region net 3V3: 2122.34,1936.5 2075.61,1936.5 2075.61,1862.89 2122.34,1862.89
  region net NetR7_1: 647.78,2179.9 623.82,2155.94 646.82,2132.94 670.78,2156.9
  rectangle net NetC68_2: 1150.5,1470 1208.5,1550.5
  rectangle net 3V3: 2963.69,-718.26 3075.5,-645
  rectangle net 3V3_AUD: 1792.76,351.96 1905.72,372.16
  region net BATT: 591.93,1748.58 647.26,1803.91 595.32,1855.84 539.99,1800.51
  rectangle net VIN1: 340.53,-55 367.45,5.5
  region net VIN1: 791.08,2003.42 824.4,2036.73 804.14,2056.99 770.82,2023.68
  region net VIN1: 848.33,1994.22 794.84,2047.7 770.82,2023.68 824.3,1970.19
  region net VCHRG: 860.73,1897.6 748.9,2009.42 723.05,1983.57 834.87,1871.74
  region net VCHRG: 773.16,2000.27 756.45,2016.97 723.05,1983.57 739.75,1966.86
  rectangle net VBUS: 866.96,1968.59 895.97,2025.11
  region net VBUS: 860.78,1933.39 895.97,1968.59 871.22,1993.34 836.03,1958.14
  rectangle net 5V: 2060.72,731.5 2081.24,856.43
  rectangle net VDDA: 1534,1672.16 1589,1714.5
  rectangle net BATT: 80.43,274.57 164.5,359.67
  rectangle net BATT: 124.5,199.49 164.5,359.67
  rectangle net 3V3: 2251.13,1008.68 2440,1082.5
  rectangle net NRST: 1230.28,290.76 1265.72,437.5
  rectangle net 3V3_AUD: 1731.73,735.76 1905,823.71
  rectangle net 3V3_AUD: 1792.76,351.96 1840,391.27
  rectangle net 3V3_AUD: 1792.76,307 1825.38,391.27
  rectangle net 3V3_AUD: 1731.73,283 1752.64,330.24
  rectangle net 3V3_AUD: 1861,810 2006.74,900
  rectangle net 3V3_AUD: 1926.39,861.95 2040.25,900
  rectangle net NetC39_2: 2060.72,861.94 2081.24,969.5
  rectangle net NetC39_2: 2051.24,934.5 2081.24,969.5
  rectangle net 5V: 2051.24,731.5 2081.24,825.68
  rectangle net 5V: 2023.35,810 2081.24,825.68
  rectangle net 5V: 2023.35,810 2040.25,856.43
  rectangle net VDD: 1437.21,1038.81 1525,1108.03
  rectangle net VDDA: 2152,1612.04 2353.98,1680
  rectangle net VDD: 2302.02,1439.75 2411.98,1592.62
  rectangle net NetC70_2: 2308,1361.01 2411.98,1414
  rectangle net NetC70_2: 2308,1303.26 2348,1414
  rectangle net NetQ7_3: 2459.86,1160.5 2493.74,1260.74
  rectangle net NetC69_1: 2337.5,1104.5 2433.74,1195.5
  rectangle net NetC69_1: 2337.5,1104.5 2388,1260.74
  rectangle net 3V3: 2251.13,1008.68 2318.5,1260.74
  rectangle net NetC85_2: 2019.3,1296 2056.7,1378.69
  rectangle net NetC80_2: 1964,1390.5 1999.61,1473
  rectangle net NetC80_2: 1895.99,1390.5 1999.61,1429.5
  rectangle net NetR63_2: 1420.66,1343.99 1468.69,1361.03
  rectangle net 5V_BOOST: 625,131.57 996.69,215
  rectangle net 5V_BOOST: 562.5,185 996.69,215
  rectangle net 5V_BOOST: 658.53,131.57 756.95,343.46
  region net SW_12V: 547.61,180.71 547.61,211.25 457.56,211.25 457.56,180.71
  rectangle net FB_12V: 457.56,105.91 597.5,130.32
  rectangle net FB_12V: 562.5,83 597.5,155
  rectangle net BATT: 80.43,199.49 164.5,223.11
  rectangle net NetQ3_3: 354.41,63.64 402.44,130.32
  rectangle net NetQ3_3: 222.5,63.64 401.75,87.77
  rectangle net NetL2_1: 80.43,100.64 345.02,136.89
  rectangle net NetL2_1: 305.65,143.31 402.44,167.72
  region net NetL2_1: 113.11,100.64 113.11,183.74 80.43,183.74 80.43,100.64
  rectangle net VBUS: 2025,-345 2371.79,-320
  rectangle net VBUS: 2025,-345 2055.32,-144.46
  rectangle net VBUS: 2025,-158.2 2129.19,-144.46
  rectangle net GND: 2161.08,-97.22 2187.46,-64.44
  rectangle net GND: 2161.08,-91.02 2227.95,-64.44
  rectangle net NetR9_1: 2144,-213.5 2204.81,-178.5
  rectangle net NetR9_1: 2161.08,-208.5 2204.81,-144.46
  rectangle net VBUS: 2319.03,-345 2371.79,-234.57
  rectangle net VBUS: 2319.03,-345 2362.86,-97.57
  rectangle net VBUS: 2319.03,-170 2404.5,-97.57
  rectangle net #VBUS: 359,465.48 398,705.51
  rectangle net #VBUS: 268.11,465.48 398,505.54
  rectangle net USB_N: 268,591.23 293,645
  rectangle net USB_N: 134.4,629.66 293,645
  rectangle net USB_N: 134.19,565.34 158.19,645
  rectangle net USB_P: 170.2,529.21 195.19,624
  rectangle net 5V_PoE: 2291.87,-55.05 2436.96,-18.83
  rectangle net 5V_PoE: 2346.25,-55.05 2436.96,273
  rectangle net NetC68_2: 1150.5,1470 1232.5,1500
  pour cut-out: 3425,755 3625.5,755 3705.5,675 3908.94,675 3937,703.06 3937,877.44 3908.94,905.5 3705.51,905.5 3625.5,825.5 3439,825.5 3625.5,825.5 3425,825.5
  pour cut-out: 610,1574.8 610,810 0.15,810 0,810.15 0,1574.8

## Silkscreen, mask and mechanical layers (free items; w line width, h text height)
Top Overlay:
  drawing of 333 lines, arcs and shapes, not listed
  text "SCL" at 1163.95,2250.32 h39.37
  text "SDA" at 1163.95,2164.88 h39.37
  text "B1" at 3027.69,2161.02 h39.37 r90
  text "B4" at 3113.69,2161.02 h39.37 r90
  text "B3" at 3199.69,2161.02 h39.37 r90
  text "B2" at 3285.69,2161.02 h39.37 r90
  text "1" at 2476,1927.43 h40 r270
  text "-" at 806.72,1891.68 h60 r45
  text "CHARGING" at 391.12,1791.31 h40 r315
  text "BATT" at 821.16,1751.32 h39.37 r45
  text "+" at 648.61,1732.51 h60 r45
  text "PWR" at 312.99,1712.54 h40 r315
  text "PMS_RX" at 3226.09,1695.37 h39.37
  text "PMS_TX" at 3226.09,1603.37 h39.37
  text "3v3_Clean" at 2287.56,992.52 h39.37
  text "3v3_Sensor" at 3135.67,990.32 h39.37
  text "GND" at 3139.67,890.32 h39.37
  text "ETH_PWR_OK" at 1710,881.62 h40
  text "1v8_Sensor" at 2285.64,879.32 h39.37
  text "VBUS" at 889.68,622.48 h39.37 r90
  text "3v3" at 3137.94,112.32 h39.37
  text "5V_Boost" at 977.8,70.32 h39.37
  text "PWR_STAT" at 1892.64,-150.37 h39.37
  text "5V" at 2583.94,-159.68 h39.37
  text "ADS Ready" at 2755,-639 h39.37
Bottom Overlay:
  drawing of 3089 lines, arcs and shapes, not listed
  text "ZERO CARBON FOOTPRINT" at 2421,-893 h45
Dimension:
  text "1" at 2476,1927.43 h40 r270
Board Outline:
  lines w10: 3439,755 3439,825.5 ; 3439,755 3439,720.55 3614.62,720.55 3693.87,641.31 3908.94,641.31 3937,613.25 3937,0 2755.9,-1181.1 1181.1,-1181.1 0,0 0,1574.8 1181.1,2755.9 2755.9,2755.9 3937,1574.8 3937,967.26 3908.94,939.2 3693.87,939.2 3614.62,859.95 3439,859.95 3439,825.5 ; 3439,755 3625.5,755 3705.5,675 3908.94,675 3937,703.06 3937,877.44 3908.94,905.5 3705.5,905.5 3625.5,825.5 3439,825.5
Fabrication:
  drawing of 295 lines, arcs and shapes, not listed
  text "Layer" at 4160.34,2932 h60
  text "Name" at 4570.26,2932 h60
  text "Material" at 5500,2932 h60
  text "Thickness" at 6359.77,2932 h60
  text "Constant" at 7009.6,2932 h60
  text "Board Layer Stack" at 7579.46,2932 h60
  text "Top Overlay" at 4570.26,2812 h60
  text "Top Solder" at 4570.26,2692 h60
  text "Solder Resist" at 5500,2692 h60
  text "0.39mil" at 6359.77,2692 h60
  text "3.3" at 7009.6,2692 h60
  text "1" at 4160.34,2572 h60
  text "Top Layer" at 4570.26,2572 h60
  text "1.38mil" at 6359.77,2572 h60
  text "Dielectric 2" at 4570.26,2452 h60
  text "FR-4" at 5500,2452 h60
  text "8.27mil" at 6359.77,2452 h60
  text "4.6" at 7009.6,2452 h60
  text "2" at 4160.34,2332 h60
  text "Signal + GND" at 4570.26,2332 h60
  text "CF-004" at 5500,2332 h60
  text "0.60mil" at 6359.77,2332 h60
  text "Dielectric 1" at 4570.26,2212 h60
  text "FR-4" at 5500,2212 h60
  text "41.93mil" at 6359.77,2212 h60
  text "4.6" at 7009.6,2212 h60
  text "3" at 4160.34,2092 h60
  text "Signal + 3v3" at 4570.26,2092 h60
  text "CF-004" at 5500,2092 h60
  text "0.60mil" at 6359.77,2092 h60
  text "Dielectric 3" at 4570.26,1972 h60
  text "FR-4" at 5500,1972 h60
  text "8.27mil" at 6359.77,1972 h60
  text "4.6" at 7009.6,1972 h60
  text "4" at 4160.34,1852 h60
  text "Bottom Layer" at 4570.26,1852 h60
  text "1.38mil" at 6359.77,1852 h60
  text "Bottom Solder" at 4570.26,1732 h60
  text "Solder Resist" at 5500,1732 h60
  text "0.39mil" at 6359.77,1732 h60
  text "3.3" at 7009.6,1732 h60
  text "Bottom Overlay" at 4570.26,1612 h60
  text "Total board thickness:" at 4160.34,1492 h60
  text "63.21mil" at 6359.77,1492 h60
Drill Drawing:
  drawing of 151 lines, arcs and shapes, not listed
  text "Symbol" at -159.5,5487.94 h72
  text "Count" at 346.38,5487.94 h72
  text "Hole Size" at 946.22,5487.94 h72
  text "Plated" at 2095.88,5487.94 h72
  text "Hole Type" at 2601.76,5487.94 h72
  text "Drill Layer Pair" at 3335.56,5487.94 h72
  text "Via/Pad" at 4835.11,5487.94 h72
  text "Pad Shape" at 5424.96,5487.94 h72
  text "Template" at 6170.76,5487.94 h72
  text "Description" at 7310.42,5487.94 h72
  text "Hole Tolerance (+)" at 8164.19,5487.94 h72
  text "Hole Tolerance (-)" at 9497.79,5487.94 h72
  text "2" at 346.38,5337.94 h60
  text "0.600mm (23.62mil)" at 946.22,5337.94 h60
  text "PTH" at 2095.88,5337.94 h60
  text "Slot" at 2601.76,5337.94 h60
  text "Top Layer - Bottom Layer" at 3335.56,5337.94 h60
  text "Pad" at 4835.11,5337.94 h60
  text "Rounded" at 5424.96,5337.94 h60
  text "r90_170h60_140r100" at 6170.76,5337.94 h60
  text "2" at 346.38,5187.94 h60
  text "0.600mm (23.62mil)" at 946.22,5187.94 h60
  text "PTH" at 2095.88,5187.94 h60
  text "Slot" at 2601.76,5187.94 h60
  text "Top Layer - Bottom Layer" at 3335.56,5187.94 h60
  text "Pad" at 4835.11,5187.94 h60
  text "Rounded" at 5424.96,5187.94 h60
  text "(Mixed)" at 6170.76,5187.94 h60
  text "2" at 346.38,5037.94 h60
  text "0.620mm (24.41mil)" at 946.22,5037.94 h60
  text "NPTH" at 2095.88,5037.94 h60
  text "Round" at 2601.76,5037.94 h60
  text "Top Layer - Bottom Layer" at 3335.56,5037.94 h60
  text "Pad" at 4835.11,5037.94 h60
  text "Rounded" at 5424.96,5037.94 h60
  text "c0hn62" at 6170.76,5037.94 h60
  text "2" at 346.38,4887.94 h60
  text "0.810mm (31.89mil)" at 946.22,4887.94 h60
  text "NPTH" at 2095.88,4887.94 h60
  text "Round" at 2601.76,4887.94 h60
  text "Top Layer - Bottom Layer" at 3335.56,4887.94 h60
  text "Pad" at 4835.11,4887.94 h60
  text "Rounded" at 5424.96,4887.94 h60
  text "c0hn81" at 6170.76,4887.94 h60
  text "2" at 346.38,4737.94 h60
  text "1.100mm (43.31mil)" at 946.22,4737.94 h60
  text "NPTH" at 2095.88,4737.94 h60
  text "Round" at 2601.76,4737.94 h60
  text "Top Layer - Bottom Layer" at 3335.56,4737.94 h60
  text "Pad" at 4835.11,4737.94 h60
  text "Rounded" at 5424.96,4737.94 h60
  text "c0hn110" at 6170.76,4737.94 h60
  text "2" at 346.38,4587.94 h60
  text "1.630mm (64.17mil)" at 946.22,4587.94 h60
  text "PTH" at 2095.88,4587.94 h60
  text "Round" at 2601.76,4587.94 h60
  text "Top Layer - Bottom Layer" at 3335.56,4587.94 h60
  text "Pad" at 4835.11,4587.94 h60
  text "Rounded" at 5424.96,4587.94 h60
  text "c300h163" at 6170.76,4587.94 h60
  text "2" at 346.38,4437.94 h60
  text "3.250mm (127.95mil)" at 946.22,4437.94 h60
  text "NPTH" at 2095.88,4437.94 h60
  text "Round" at 2601.76,4437.94 h60
  text "Top Layer - Bottom Layer" at 3335.56,4437.94 h60
  text "Pad" at 4835.11,4437.94 h60
  text "Rounded" at 5424.96,4437.94 h60
  text "c0hn325" at 6170.76,4437.94 h60
  text "3" at 346.38,4287.94 h60
  text "3.200mm (125.98mil)" at 946.22,4287.94 h60
  text "NPTH" at 2095.88,4287.94 h60
  text "Round" at 2601.76,4287.94 h60
  text "Top Layer - Bottom Layer" at 3335.56,4287.94 h60
  text "Pad" at 4835.11,4287.94 h60
  text "Rounded" at 5424.96,4287.94 h60
  text "c320hn320" at 6170.76,4287.94 h60
  text "4" at 346.38,4137.94 h60
  text "0.950mm (37.40mil)" at 946.22,4137.94 h60
  text "PTH" at 2095.88,4137.94 h60
  text "Round" at 2601.76,4137.94 h60
  text "Top Layer - Bottom Layer" at 3335.56,4137.94 h60
  text "Pad" at 4835.11,4137.94 h60
  text "(Mixed)" at 5424.96,4137.94 h60
  text "(Mixed)" at 6170.76,4137.94 h60
  text "4" at 346.38,3987.94 h60
  text "1.020mm (40.16mil)" at 946.22,3987.94 h60
  text "PTH" at 2095.88,3987.94 h60
  text "Round" at 2601.76,3987.94 h60
  text "Top Layer - Bottom Layer" at 3335.56,3987.94 h60
  text "Pad" at 4835.11,3987.94 h60
  text "Rounded" at 5424.96,3987.94 h60
  text "c200h102" at 6170.76,3987.94 h60
  text "9" at 346.38,3837.94 h60
  text "0.900mm (35.43mil)" at 946.22,3837.94 h60
  text "PTH" at 2095.88,3837.94 h60
  text "Round" at 2601.76,3837.94 h60
  text "Top Layer - Bottom Layer" at 3335.56,3837.94 h60
  text "Pad" at 4835.11,3837.94 h60
  text "(Mixed)" at 5424.96,3837.94 h60
  text "(Mixed)" at 6170.76,3837.94 h60
  text "9" at 346.38,3687.94 h60
  text "0.910mm (35.83mil)" at 946.22,3687.94 h60
  text "PTH" at 2095.88,3687.94 h60
  text "Round" at 2601.76,3687.94 h60
  text "Top Layer - Bottom Layer" at 3335.56,3687.94 h60
  text "Pad" at 4835.11,3687.94 h60
  text "Rounded" at 5424.96,3687.94 h60
  text "c180h91" at 6170.76,3687.94 h60
  text "395" at 346.38,3537.94 h60
  text "0.300mm (11.81mil)" at 946.22,3537.94 h60
  text "PTH" at 2095.88,3537.94 h60
  text "Round" at 2601.76,3537.94 h60
  text "Top Layer - Bottom Layer" at 3335.56,3537.94 h60
  text "Via" at 4835.11,3537.94 h60
  text "Rounded" at 5424.96,3537.94 h60
  text "(Mixed)" at 6170.76,3537.94 h60
  text "438 Total" at 346.38,3387.94 h60
  text "Slot definitions :" at -159.5,3242.97 h60
  text "Routed Path Length" at 873.19,3242.97 h60
  text "= Calculated from tool start centre position to tool end centre position." at 1975.86,3242.97 h60
  text "Hole Length" at 873.19,3142.99 h60
  text "= Routed Path Length + Tool Size = Slot length as defined in the PCB layout" at 1565.99,3142.99 h60

## Dimensions
1181.1,2755.9 to 1181.1,-1181.1 on Dimension
0,0 to 0,1574.8 on Dimension

## Text inside footprints (layer, text, board x,y; h text height)
J1: Top Overlay "Board Edge" at 50.46,723.2 h28 r270
J2: Top Overlay "PCB Edge" at 463.73,1984.27 h47.24 r45
J4: Top Overlay "Board Edge" at 2295.86,1814 h30 r270; Top Overlay "1" at 2405,1849.43 h30 r270
J6: Top Overlay "PCB Edge" at 2969.94,1379.5 h31.5 r270
J13: Top Overlay "PCB Edge" at 13.25,1239.95 h60 r270
SW2: Top Overlay "PCB Edge" at 123.04,134.2 h19.68 r90
SW3: Bottom Overlay "PCB Edge" at 16.87,194.24 h11.81 r270